# Altium PCB MiniPC.PcbDoc (part 5 of 24)
Units mm, origin at the board's own origin, x right, y up, seen from the top; angles counter-clockwise.
Board outline 175 x 155 mm, 16 copper layers (1_Top, 2_int1_(gnd), 3_int2_(power), 4_int3_(gnd), 5_int4_(sign), 6_int5_(power), 7_int6_(sign), 8_int7_(power), 9_int8_(gnd), 10_int9_(sign), 11_int10_(gnd), 12_int11_(sign), 13_int12_(gnd), 14_int13_(power), 15_int14_(gnd), 16_Bottom), stack 2.008 mm thick; 1046 components, 837 nets, 6010 pads, 4009 vias.
Unrouted connection lines stored in the file: 564.
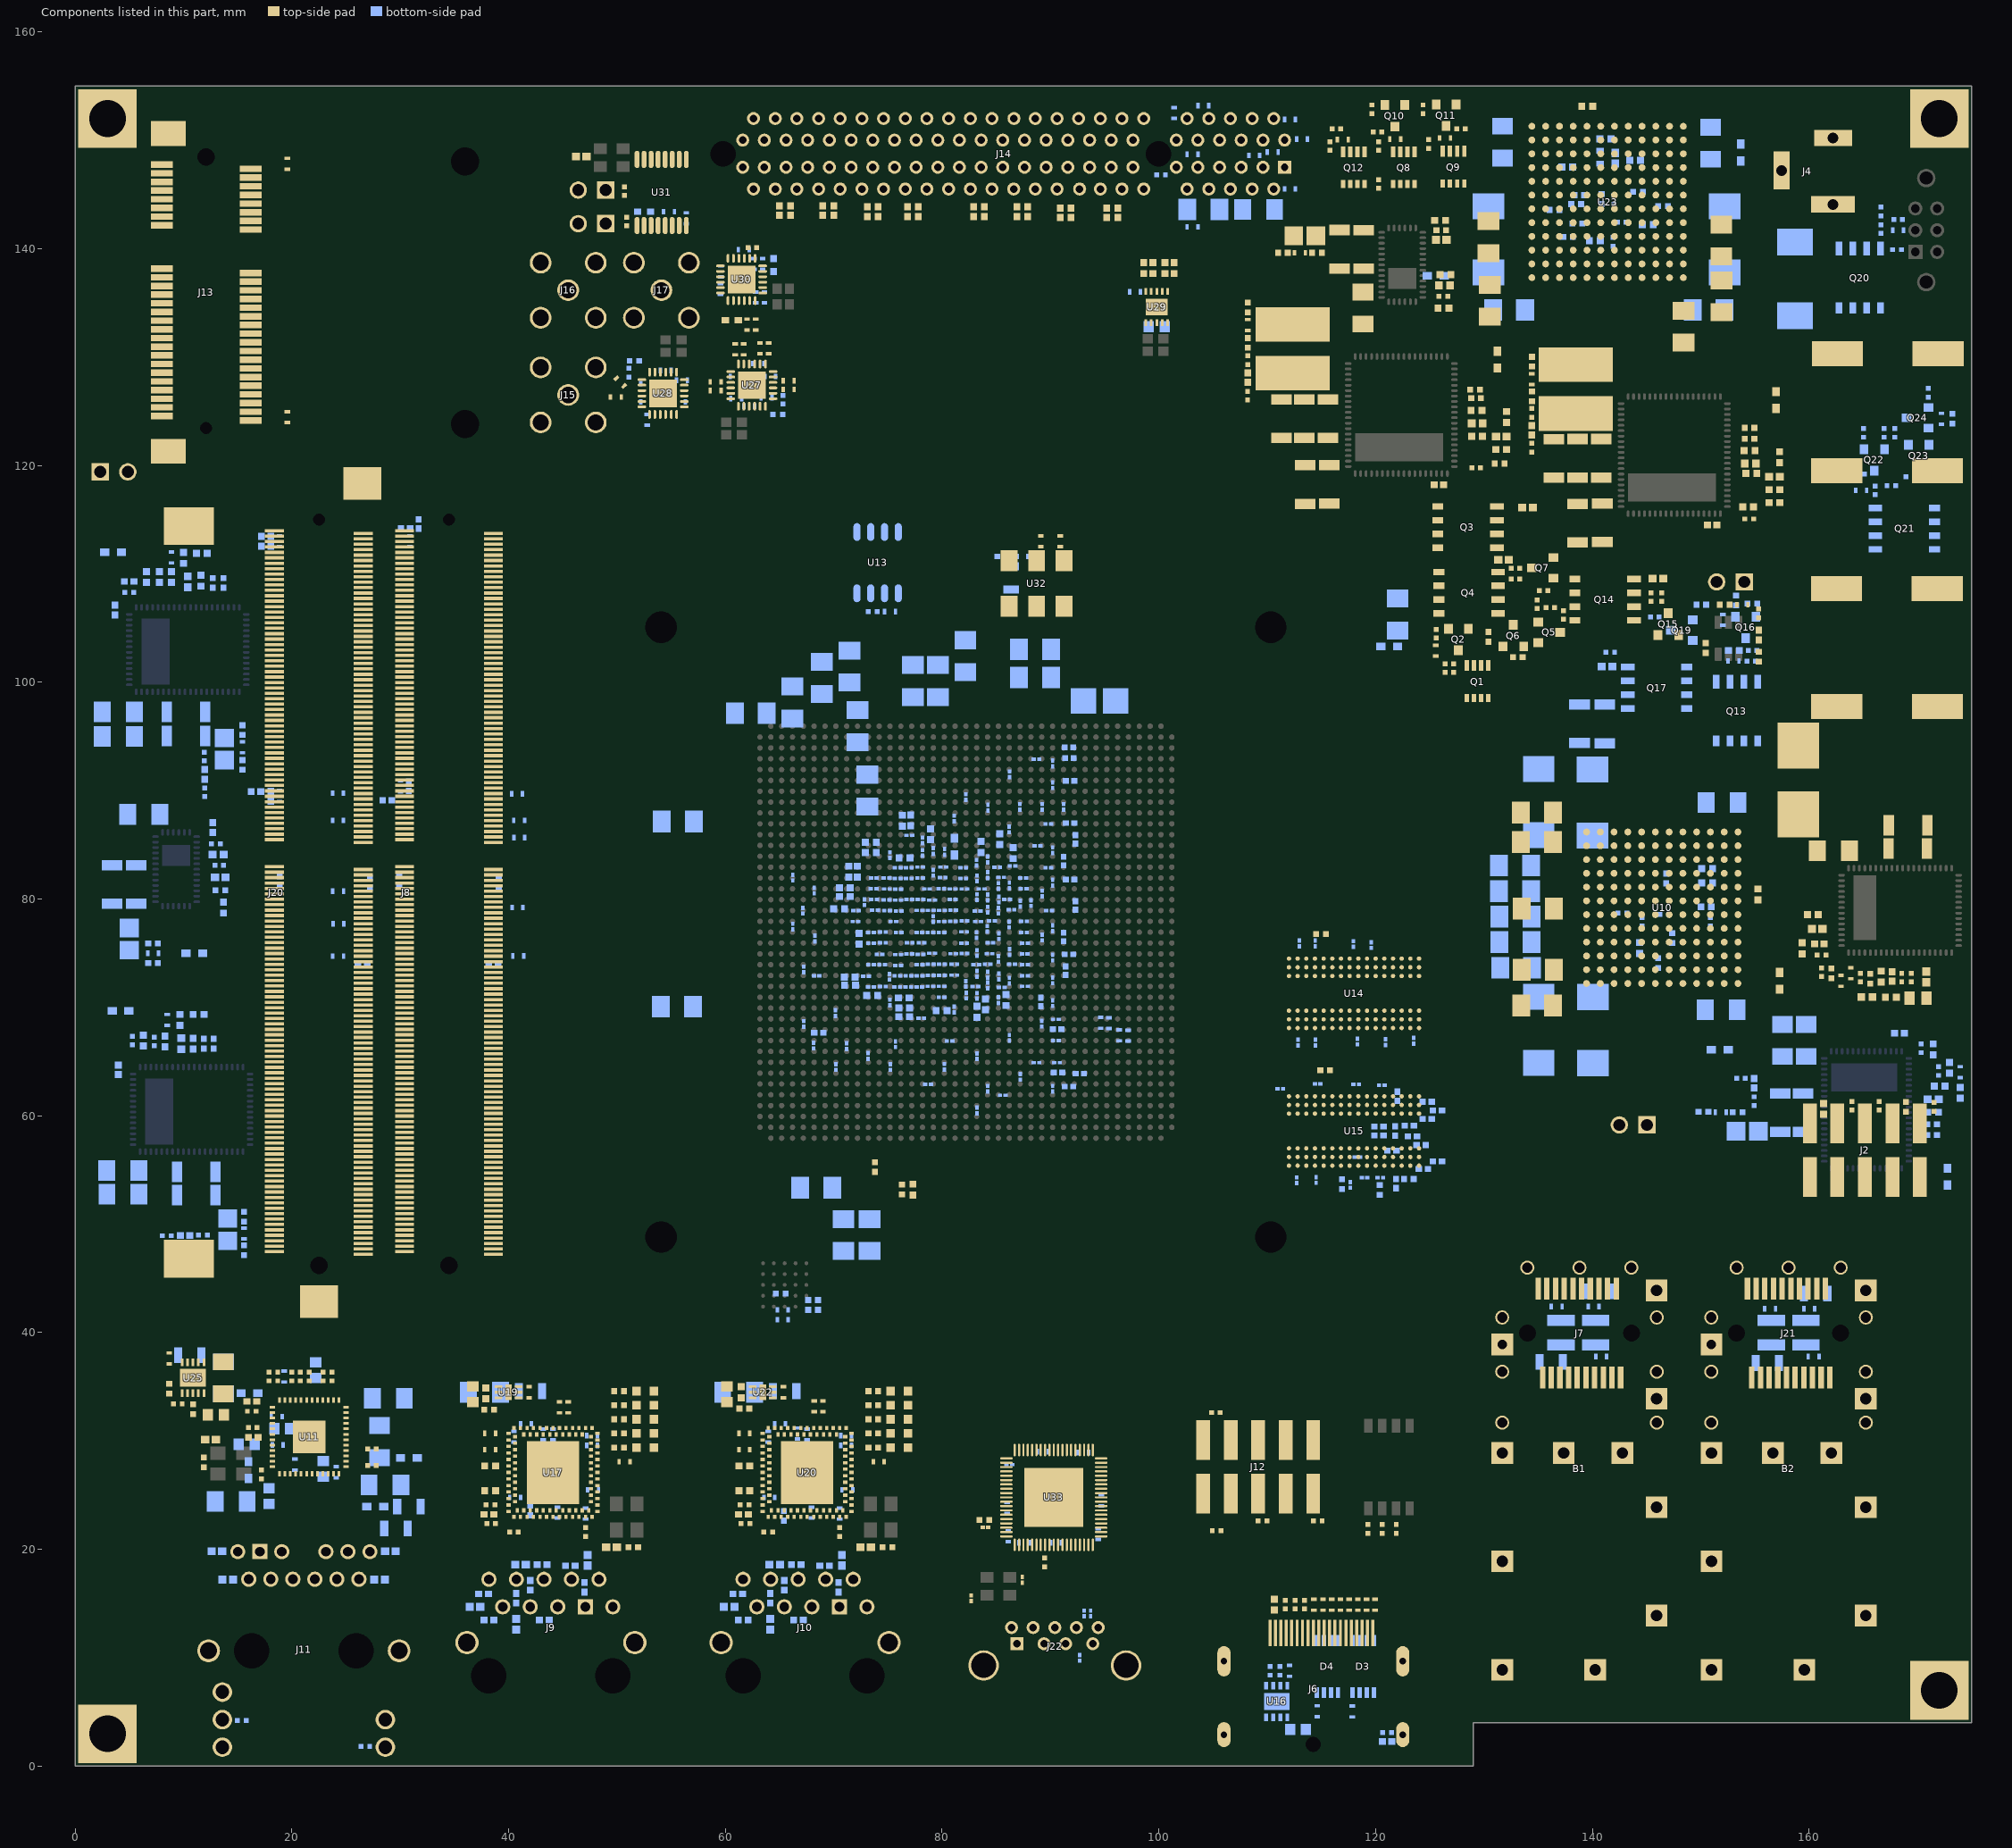
[diagram p19: the components of this part, seen from the top]

## Footprints (in the part's own frame and the unit in brackets; to place one, negate y for a bottom-side part, rotate by r counter-clockwise, add the part's x,y. Pads: shape width x height; smd on the part's side, far side on the other; paste and mask are expansions set on the pad) (continued)
FOXC-AS0A823-H4SB-7H_V [mm] "DIMM Socket, 260-Leads, Body Length 73.1mm, Pitch 0.5mm"
  rect 0.3x1.75 smd: 1(-33.375,-4.1) 2(-33.125,4.1) 3(-32.875,-4.1) 4(-32.625,4.1) 5(-32.375,-4.1) 6(-32.125,4.1) 7(-31.875,-4.1) 8(-31.625,4.1) 9(-31.375,-4.1) 10(-31.125,4.1) 11(-30.875,-4.1) 12(-30.625,4.1) 13(-30.375,-4.1) 14(-30.125,4.1) 15(-29.875,-4.1) 16(-29.625,4.1) 17(-29.375,-4.1) 18(-29.125,4.1) 19(-28.875,-4.1) 20(-28.625,4.1) 21(-28.375,-4.1) 22(-28.125,4.1) 23(-27.875,-4.1) 24(-27.625,4.1) 25(-27.375,-4.1) 26(-27.125,4.1) 27(-26.875,-4.1) 28(-26.625,4.1) 29(-26.375,-4.1) 30(-26.125,4.1) 31(-25.875,-4.1) 32(-25.625,4.1) 33(-25.375,-4.1) 34(-25.125,4.1) 35(-24.875,-4.1) 36(-24.625,4.1) 37(-24.375,-4.1) 38(-24.125,4.1) 39(-23.875,-4.1) 40(-23.625,4.1) 41(-23.375,-4.1) 42(-23.125,4.1) 43(-22.875,-4.1) 44(-22.625,4.1) 45(-22.375,-4.1) 46(-22.125,4.1) 47(-21.875,-4.1) 48(-21.625,4.1) 49(-21.375,-4.1) 50(-21.125,4.1) 51(-20.875,-4.1) 52(-20.625,4.1) 53(-20.375,-4.1) 54(-20.125,4.1) 55(-19.875,-4.1) 56(-19.625,4.1) 57(-19.375,-4.1) 58(-19.125,4.1) 59(-18.875,-4.1) 60(-18.625,4.1) 61(-18.375,-4.1) 62(-18.125,4.1) 63(-17.875,-4.1) 64(-17.625,4.1) 65(-17.375,-4.1) 66(-17.125,4.1) 67(-16.875,-4.1) 68(-16.625,4.1) 69(-16.375,-4.1) 70(-16.125,4.1) 71(-15.875,-4.1) 72(-15.625,4.1) 73(-15.375,-4.1) 74(-15.125,4.1) 75(-14.875,-4.1) 76(-14.625,4.1) 77(-14.375,-4.1) 78(-14.125,4.1) 79(-13.875,-4.1) 80(-13.625,4.1) 81(-13.375,-4.1) 82(-13.125,4.1) 83(-12.875,-4.1) 84(-12.625,4.1) 85(-12.375,-4.1) 86(-12.125,4.1) 87(-11.875,-4.1) 88(-11.625,4.1) 89(-11.375,-4.1) 90(-11.125,4.1) 91(-10.875,-4.1) 92(-10.625,4.1) 93(-10.375,-4.1) 94(-10.125,4.1) 95(-9.875,-4.1) 96(-9.625,4.1) 97(-9.375,-4.1) 98(-9.125,4.1) 99(-8.875,-4.1) 100(-8.625,4.1) 101(-8.375,-4.1) 102(-8.125,4.1) 103(-7.875,-4.1) 104(-7.625,4.1) 105(-7.375,-4.1) 106(-7.125,4.1) 107(-6.875,-4.1) 108(-6.625,4.1) 109(-6.375,-4.1) 110(-6.125,4.1) 111(-5.875,-4.1) 112(-5.625,4.1) 113(-5.375,-4.1) 114(-5.125,4.1) 115(-4.875,-4.1) 116(-4.625,4.1) 117(-4.375,-4.1) 118(-4.125,4.1) 119(-3.875,-4.1) 120(-3.625,4.1) 121(-3.375,-4.1) 122(-3.125,4.1) 123(-2.875,-4.1) 124(-2.625,4.1) 125(-2.375,-4.1) 126(-2.125,4.1) 127(-1.875,-4.1) 128(-1.625,4.1) 129(-1.375,-4.1) 130(-1.125,4.1) 131(-0.875,-4.1) 132(-0.625,4.1) 133(-0.375,-4.1) 134(-0.125,4.1) 135(0.125,-4.1) 136(0.375,4.1) 137(0.625,-4.1) 138(0.875,4.1) 139(1.125,-4.1) 140(1.375,4.1) 141(1.625,-4.1) 142(1.875,4.1) 143(2.125,-4.1) 144(2.375,4.1) 145(4.625,-4.1) 146(4.875,4.1) 147(5.125,-4.1) 148(5.375,4.1) 149(5.625,-4.1) 150(5.875,4.1) 151(6.125,-4.1) 152(6.375,4.1) 153(6.625,-4.1) 154(6.875,4.1) 155(7.125,-4.1) 156(7.375,4.1) 157(7.625,-4.1) 158(7.875,4.1) 159(8.125,-4.1) 160(8.375,4.1) 161(8.625,-4.1) 162(8.875,4.1) 163(9.125,-4.1) 164(9.375,4.1) 165(9.625,-4.1) 166(9.875,4.1) 167(10.125,-4.1) 168(10.375,4.1) 169(10.625,-4.1) 170(10.875,4.1) 171(11.125,-4.1) 172(11.375,4.1) 173(11.625,-4.1) 174(11.875,4.1) 175(12.125,-4.1) 176(12.375,4.1) 177(12.625,-4.1) 178(12.875,4.1) 179(13.125,-4.1) 180(13.375,4.1) 181(13.625,-4.1) 182(13.875,4.1) 183(14.125,-4.1) 184(14.375,4.1) 185(14.625,-4.1) 186(14.875,4.1) 187(15.125,-4.1) 188(15.375,4.1) 189(15.625,-4.1) 190(15.875,4.1) 191(16.125,-4.1) 192(16.375,4.1) 193(16.625,-4.1) 194(16.875,4.1) 195(17.125,-4.1) 196(17.375,4.1) 197(17.625,-4.1) 198(17.875,4.1) 199(18.125,-4.1) 200(18.375,4.1) 201(18.625,-4.1) 202(18.875,4.1) 203(19.125,-4.1) 204(19.375,4.1) 205(19.625,-4.1) 206(19.875,4.1) 207(20.125,-4.1) 208(20.375,4.1) 209(20.625,-4.1) 210(20.875,4.1) 211(21.125,-4.1) 212(21.375,4.1) 213(21.625,-4.1) 214(21.875,4.1) 215(22.125,-4.1) 216(22.375,4.1) 217(22.625,-4.1) 218(22.875,4.1) 219(23.125,-4.1) 220(23.375,4.1) 221(23.625,-4.1) 222(23.875,4.1) 223(24.125,-4.1) 224(24.375,4.1) 225(24.625,-4.1) 226(24.875,4.1) 227(25.125,-4.1) 228(25.375,4.1) 229(25.625,-4.1) 230(25.875,4.1) 231(26.125,-4.1) 232(26.375,4.1) 233(26.625,-4.1) 234(26.875,4.1) 235(27.125,-4.1) 236(27.375,4.1) 237(27.625,-4.1) 238(27.875,4.1) 239(28.125,-4.1) 240(28.375,4.1) 241(28.625,-4.1) 242(28.875,4.1) 243(29.125,-4.1) 244(29.375,4.1) 245(29.625,-4.1) 246(29.875,4.1) 247(30.125,-4.1) 248(30.375,4.1) 249(30.625,-4.1) 250(30.875,4.1) 251(31.125,-4.1) 252(31.375,4.1) 253(31.625,-4.1) 254(31.875,4.1) 255(32.125,-4.1) 256(32.375,4.1) 257(32.625,-4.1) 258(32.875,4.1) 259(33.125,-4.1) 260(33.375,4.1)
  round 1.3 hole 1.6 unplated: MH1(-34.4,0)
  round 0.8 hole 1.1 unplated: MH2(34.4,0)
  rect 3.5x4.6 smd: MP1(-33.8,12) MP2(33.8,12)
  silkscreen extent -36.54,-5.65 36.55,20.98, body extent -36.55,-4.78 36.55,20.98, height 4.11
FOXC-AS0A823-H8SB-7H_V [mm] "DIMM Socket, 260-Leads, Body Length 73.1mm, Pitch 0.5mm"
  rect 0.3x1.75 smd: 1(-33.375,-4.1) 2(-33.125,4.1) 3(-32.875,-4.1) 4(-32.625,4.1) 5(-32.375,-4.1) 6(-32.125,4.1) 7(-31.875,-4.1) 8(-31.625,4.1) 9(-31.375,-4.1) 10(-31.125,4.1) 11(-30.875,-4.1) 12(-30.625,4.1) 13(-30.375,-4.1) 14(-30.125,4.1) 15(-29.875,-4.1) 16(-29.625,4.1) 17(-29.375,-4.1) 18(-29.125,4.1) 19(-28.875,-4.1) 20(-28.625,4.1) 21(-28.375,-4.1) 22(-28.125,4.1) 23(-27.875,-4.1) 24(-27.625,4.1) 25(-27.375,-4.1) 26(-27.125,4.1) 27(-26.875,-4.1) 28(-26.625,4.1) 29(-26.375,-4.1) 30(-26.125,4.1) 31(-25.875,-4.1) 32(-25.625,4.1) 33(-25.375,-4.1) 34(-25.125,4.1) 35(-24.875,-4.1) 36(-24.625,4.1) 37(-24.375,-4.1) 38(-24.125,4.1) 39(-23.875,-4.1) 40(-23.625,4.1) 41(-23.375,-4.1) 42(-23.125,4.1) 43(-22.875,-4.1) 44(-22.625,4.1) 45(-22.375,-4.1) 46(-22.125,4.1) 47(-21.875,-4.1) 48(-21.625,4.1) 49(-21.375,-4.1) 50(-21.125,4.1) 51(-20.875,-4.1) 52(-20.625,4.1) 53(-20.375,-4.1) 54(-20.125,4.1) 55(-19.875,-4.1) 56(-19.625,4.1) 57(-19.375,-4.1) 58(-19.125,4.1) 59(-18.875,-4.1) 60(-18.625,4.1) 61(-18.375,-4.1) 62(-18.125,4.1) 63(-17.875,-4.1) 64(-17.625,4.1) 65(-17.375,-4.1) 66(-17.125,4.1) 67(-16.875,-4.1) 68(-16.625,4.1) 69(-16.375,-4.1) 70(-16.125,4.1) 71(-15.875,-4.1) 72(-15.625,4.1) 73(-15.375,-4.1) 74(-15.125,4.1) 75(-14.875,-4.1) 76(-14.625,4.1) 77(-14.375,-4.1) 78(-14.125,4.1) 79(-13.875,-4.1) 80(-13.625,4.1) 81(-13.375,-4.1) 82(-13.125,4.1) 83(-12.875,-4.1) 84(-12.625,4.1) 85(-12.375,-4.1) 86(-12.125,4.1) 87(-11.875,-4.1) 88(-11.625,4.1) 89(-11.375,-4.1) 90(-11.125,4.1) 91(-10.875,-4.1) 92(-10.625,4.1) 93(-10.375,-4.1) 94(-10.125,4.1) 95(-9.875,-4.1) 96(-9.625,4.1) 97(-9.375,-4.1) 98(-9.125,4.1) 99(-8.875,-4.1) 100(-8.625,4.1) 101(-8.375,-4.1) 102(-8.125,4.1) 103(-7.875,-4.1) 104(-7.625,4.1) 105(-7.375,-4.1) 106(-7.125,4.1) 107(-6.875,-4.1) 108(-6.625,4.1) 109(-6.375,-4.1) 110(-6.125,4.1) 111(-5.875,-4.1) 112(-5.625,4.1) 113(-5.375,-4.1) 114(-5.125,4.1) 115(-4.875,-4.1) 116(-4.625,4.1) 117(-4.375,-4.1) 118(-4.125,4.1) 119(-3.875,-4.1) 120(-3.625,4.1) 121(-3.375,-4.1) 122(-3.125,4.1) 123(-2.875,-4.1) 124(-2.625,4.1) 125(-2.375,-4.1) 126(-2.125,4.1) 127(-1.875,-4.1) 128(-1.625,4.1) 129(-1.375,-4.1) 130(-1.125,4.1) 131(-0.875,-4.1) 132(-0.625,4.1) 133(-0.375,-4.1) 134(-0.125,4.1) 135(0.125,-4.1) 136(0.375,4.1) 137(0.625,-4.1) 138(0.875,4.1) 139(1.125,-4.1) 140(1.375,4.1) 141(1.625,-4.1) 142(1.875,4.1) 143(2.125,-4.1) 144(2.375,4.1) 145(4.625,-4.1) 146(4.875,4.1) 147(5.125,-4.1) 148(5.375,4.1) 149(5.625,-4.1) 150(5.875,4.1) 151(6.125,-4.1) 152(6.375,4.1) 153(6.625,-4.1) 154(6.875,4.1) 155(7.125,-4.1) 156(7.375,4.1) 157(7.625,-4.1) 158(7.875,4.1) 159(8.125,-4.1) 160(8.375,4.1) 161(8.625,-4.1) 162(8.875,4.1) 163(9.125,-4.1) 164(9.375,4.1) 165(9.625,-4.1) 166(9.875,4.1) 167(10.125,-4.1) 168(10.375,4.1) 169(10.625,-4.1) 170(10.875,4.1) 171(11.125,-4.1) 172(11.375,4.1) 173(11.625,-4.1) 174(11.875,4.1) 175(12.125,-4.1) 176(12.375,4.1) 177(12.625,-4.1) 178(12.875,4.1) 179(13.125,-4.1) 180(13.375,4.1) 181(13.625,-4.1) 182(13.875,4.1) 183(14.125,-4.1) 184(14.375,4.1) 185(14.625,-4.1) 186(14.875,4.1) 187(15.125,-4.1) 188(15.375,4.1) 189(15.625,-4.1) 190(15.875,4.1) 191(16.125,-4.1) 192(16.375,4.1) 193(16.625,-4.1) 194(16.875,4.1) 195(17.125,-4.1) 196(17.375,4.1) 197(17.625,-4.1) 198(17.875,4.1) 199(18.125,-4.1) 200(18.375,4.1) 201(18.625,-4.1) 202(18.875,4.1) 203(19.125,-4.1) 204(19.375,4.1) 205(19.625,-4.1) 206(19.875,4.1) 207(20.125,-4.1) 208(20.375,4.1) 209(20.625,-4.1) 210(20.875,4.1) 211(21.125,-4.1) 212(21.375,4.1) 213(21.625,-4.1) 214(21.875,4.1) 215(22.125,-4.1) 216(22.375,4.1) 217(22.625,-4.1) 218(22.875,4.1) 219(23.125,-4.1) 220(23.375,4.1) 221(23.625,-4.1) 222(23.875,4.1) 223(24.125,-4.1) 224(24.375,4.1) 225(24.625,-4.1) 226(24.875,4.1) 227(25.125,-4.1) 228(25.375,4.1) 229(25.625,-4.1) 230(25.875,4.1) 231(26.125,-4.1) 232(26.375,4.1) 233(26.625,-4.1) 234(26.875,4.1) 235(27.125,-4.1) 236(27.375,4.1) 237(27.625,-4.1) 238(27.875,4.1) 239(28.125,-4.1) 240(28.375,4.1) 241(28.625,-4.1) 242(28.875,4.1) 243(29.125,-4.1) 244(29.375,4.1) 245(29.625,-4.1) 246(29.875,4.1) 247(30.125,-4.1) 248(30.375,4.1) 249(30.625,-4.1) 250(30.875,4.1) 251(31.125,-4.1) 252(31.375,4.1) 253(31.625,-4.1) 254(31.875,4.1) 255(32.125,-4.1) 256(32.375,4.1) 257(32.625,-4.1) 258(32.875,4.1) 259(33.125,-4.1) 260(33.375,4.1)
  round 1.3 hole 1.6 unplated: MH1(-34.4,0)
  round 0.8 hole 1.1 unplated: MH2(34.4,0)
  rect 3x3.5 smd: MP1(-37.75,12) MP2(37.75,8)
  silkscreen extent -36.55,-5.65 36.55,6.13, body extent -36.92,-4.77 36.95,18.7, height 9.12
FTDI-QFN-76_M [mm] "QFN, 76-Leads, Body 9.1x9.1mm, Pitch 0.4mm, Thermal Pad 5.45x5.45mm, IPC Low Density"
  oval 1.15x0.2 smd: 1(-4.375,3.6) 2(-4.375,3.2) 3(-4.375,2.8) 4(-4.375,2.4) 5(-4.375,2) 6(-4.375,1.6) 7(-4.375,1.2) 8(-4.375,0.8) 9(-4.375,0.4) 10(-4.375,0) 11(-4.375,-0.4) 12(-4.375,-0.8) 13(-4.375,-1.2) 14(-4.375,-1.6) 15(-4.375,-2) 16(-4.375,-2.4) 17(-4.375,-2.8) 18(-4.375,-3.2) 19(-4.375,-3.6) 39(4.375,-3.6) 40(4.375,-3.2) 41(4.375,-2.8) 42(4.375,-2.4) 43(4.375,-2) 44(4.375,-1.6) 45(4.375,-1.2) 46(4.375,-0.8) 47(4.375,-0.4) 48(4.375,0) 49(4.375,0.4) 50(4.375,0.8) 51(4.375,1.2) 52(4.375,1.6) 53(4.375,2) 54(4.375,2.4) 55(4.375,2.8) 56(4.375,3.2) 57(4.375,3.6)
  oval 0.2x1.15 smd: 20(-3.6,-4.375) 21(-3.2,-4.375) 22(-2.8,-4.375) 23(-2.4,-4.375) 24(-2,-4.375) 25(-1.6,-4.375) 26(-1.2,-4.375) 27(-0.8,-4.375) 28(-0.4,-4.375) 29(0,-4.375) 30(0.4,-4.375) 31(0.8,-4.375) 32(1.2,-4.375) 33(1.6,-4.375) 34(2,-4.375) 35(2.4,-4.375) 36(2.8,-4.375) 37(3.2,-4.375) 38(3.6,-4.375) 58(3.6,4.375) 59(3.2,4.375) 60(2.8,4.375) 61(2.4,4.375) 62(2,4.375) 63(1.6,4.375) 64(1.2,4.375) 65(0.8,4.375) 66(0.4,4.375) 67(0,4.375) 68(-0.4,4.375) 69(-0.8,4.375) 70(-1.2,4.375) 71(-1.6,4.375) 72(-2,4.375) 73(-2.4,4.375) 74(-2.8,4.375) 75(-3.2,4.375) 76(-3.6,4.375)
  rect 5.45x5.45 smd: 77(0,0)
  silkscreen extent -5.47,-4.7 4.7,4.7, body extent -4.55,-4.55 4.55,4.55, height 1
"FULL FAN MINI" [mm]
  body extent -35.62,-35.62 35.63,35.63, height 27.12
IDT-TSSOP-16_M [mm] "TSSOP, 16-Leads, Body 5.10x4.50mm, Pitch 0.65mm, IPC Low Density"
  oval 1.6x0.45 smd: 1(-3.05,2.275) 2(-3.05,1.625) 3(-3.05,0.975) 4(-3.05,0.325) 5(-3.05,-0.325) 6(-3.05,-0.975) 7(-3.05,-1.625) 8(-3.05,-2.275) 9(3.05,-2.275) 10(3.05,-1.625) 11(3.05,-0.975) 12(3.05,-0.325) 13(3.05,0.325) 14(3.05,0.975) 15(3.05,1.625) 16(3.05,2.275)
  silkscreen extent -3.17,-2.55 1.85,3.17, body extent -3.2,-2.55 3.2,2.55, height 1.2
KEMT-520-B-2_M [mm] "Molded Capacitor, 2-Leads, Body 3.7x3mm, IPC Low Density"
  rect 2.35x2.35 smd: 1(-1.475,0) 2(1.475,0)
  silkscreen extent -2.62,-1.5 1.85,1.85, body extent -1.85,-1.5 1.85,1.5, height 2.11
KOBI-16PJ032_V [mm] "THD, 3-Leads, Body 8.9916x13.4874mm"
  rect 1.5x4.05 hole 0.991 slot 3.505 at 90 deg: 1(-6.121,0)
  rect 3.5x1.5 hole 0.991 slot 2.997 at 0 deg: 2(-2.997,4.75)
  rect 1.5x3.5 hole 0.991 slot 2.997 at 90 deg: 3(0,0)
  silkscreen extent -7.55,-4.5 7.62,4.5, body extent -6.78,-4.5 7.62,5, height 11
LFUS-0154001.DR_V [mm] "SMD, 2-Leads, Body 9.73x5.03mm"
  rect 4.24x3.81 smd: 1(-3.185,0) 2(3.185,0)
  silkscreen extent -4.87,-2.52 4.86,2.51, body extent -4.87,-2.52 4.86,2.51, height 3.81
LHT-LTI-SASF54GT_V [mm] "THD, 5-Leads, Body 6.35x6.35mm, Pitch 2.54mm"
  round 2 hole 1.5: 1(0,0) 2(-2.54,2.54) 3(2.54,2.54) 4(-2.54,-2.54) 5(2.54,-2.54)
  silkscreen extent -3.17,-3.17 3.17,3.17, body extent -3.17,-3.17 3.18,3.18, height 9.5
LT-BGA-144-05-08-1920_V [mm] "BGA, 144-Balls, Body 16x16mm, Pitch 1.27mm"
  round 0.63 smd: A1(-6.985,6.985) A2(-5.715,6.985) A3(-4.445,6.985) A4(-3.175,6.985) A5(-1.905,6.985) A6(-0.635,6.985) A7(0.635,6.985) A8(1.905,6.985) A9(3.175,6.985) A10(4.445,6.985) A11(5.715,6.985) A12(6.985,6.985) B1(-6.985,5.715) B2(-5.715,5.715) B3(-4.445,5.715) B4(-3.175,5.715) B5(-1.905,5.715) B6(-0.635,5.715) B7(0.635,5.715) B8(1.905,5.715) B9(3.175,5.715) B10(4.445,5.715) B11(5.715,5.715) B12(6.985,5.715) C1(-6.985,4.445) C2(-5.715,4.445) C3(-4.445,4.445) C4(-3.175,4.445) C5(-1.905,4.445) C6(-0.635,4.445) C7(0.635,4.445) C8(1.905,4.445) C9(3.175,4.445) C10(4.445,4.445) C11(5.715,4.445) C12(6.985,4.445) D1(-6.985,3.175) D2(-5.715,3.175) D3(-4.445,3.175) D4(-3.175,3.175) D5(-1.905,3.175) D6(-0.635,3.175) D7(0.635,3.175) D8(1.905,3.175) D9(3.175,3.175) D10(4.445,3.175) D11(5.715,3.175) D12(6.985,3.175) E1(-6.985,1.905) E2(-5.715,1.905) E3(-4.445,1.905) E4(-3.175,1.905) E5(-1.905,1.905) E6(-0.635,1.905) E7(0.635,1.905) E8(1.905,1.905) E9(3.175,1.905) E10(4.445,1.905) E11(5.715,1.905) E12(6.985,1.905) F1(-6.985,0.635) F2(-5.715,0.635) F3(-4.445,0.635) F4(-3.175,0.635) F5(-1.905,0.635) F6(-0.635,0.635) F7(0.635,0.635) F8(1.905,0.635) F9(3.175,0.635) F10(4.445,0.635) F11(5.715,0.635) F12(6.985,0.635) G1(-6.985,-0.635) G2(-5.715,-0.635) G3(-4.445,-0.635) G4(-3.175,-0.635) G5(-1.905,-0.635) G6(-0.635,-0.635) G7(0.635,-0.635) G8(1.905,-0.635) G9(3.175,-0.635) G10(4.445,-0.635) G11(5.715,-0.635) G12(6.985,-0.635) H1(-6.985,-1.905) H2(-5.715,-1.905) H3(-4.445,-1.905) H4(-3.175,-1.905) H5(-1.905,-1.905) H6(-0.635,-1.905) H7(0.635,-1.905) H8(1.905,-1.905) H9(3.175,-1.905) H10(4.445,-1.905) H11(5.715,-1.905) H12(6.985,-1.905) J1(-6.985,-3.175) J2(-5.715,-3.175) J3(-4.445,-3.175) J4(-3.175,-3.175) J5(-1.905,-3.175) J6(-0.635,-3.175) J7(0.635,-3.175) J8(1.905,-3.175) J9(3.175,-3.175) J10(4.445,-3.175) J11(5.715,-3.175) J12(6.985,-3.175) K1(-6.985,-4.445) K2(-5.715,-4.445) K3(-4.445,-4.445) K4(-3.175,-4.445) K5(-1.905,-4.445) K6(-0.635,-4.445) K7(0.635,-4.445) K8(1.905,-4.445) K9(3.175,-4.445) K10(4.445,-4.445) K11(5.715,-4.445) K12(6.985,-4.445) L1(-6.985,-5.715) L2(-5.715,-5.715) L3(-4.445,-5.715) L4(-3.175,-5.715) L5(-1.905,-5.715) L6(-0.635,-5.715) L7(0.635,-5.715) L8(1.905,-5.715) L9(3.175,-5.715) L10(4.445,-5.715) L11(5.715,-5.715) L12(6.985,-5.715) M1(-6.985,-6.985) M2(-5.715,-6.985) M3(-4.445,-6.985) M4(-3.175,-6.985) M5(-1.905,-6.985) M6(-0.635,-6.985) M7(0.635,-6.985) M8(1.905,-6.985) M9(3.175,-6.985) M10(4.445,-6.985) M11(5.715,-6.985) M12(6.985,-6.985)
  silkscreen extent -8.77,-8 8,8, body extent -8,-8 8,8, height 5.21
LT-DC6-6_V [mm] "SON, 6-Leads, Body 2x2mm, Pitch 0.5mm, Thermal Pad 1.42x0.61mm"
  rect 0.7x0.25 smd mask+0.102: 1(-0.925,0.5) 2(-0.925,0) 4(0.925,-0.5) 5(0.925,0)
  rect 0.7x0.25 smd paste+0 mask+0.102: 3(-0.925,-0.5)
  rect 0.7x0.25 smd: 6(0.925,0.5)
  rect 0.61x1.42 smd: 7(0,0)
  silkscreen extent -1.5,-1.05 1.05,1.1, body extent -1,-1 1,1, height 0.8
LT-DD-10_V [mm] "SON, 10-Leads, Body 3x3mm, Pitch 0.5mm, Thermal Pad 2.38x1.65mm"
  rect 0.7x0.25 smd mask+0.102: 1(-1.425,1) 2(-1.425,0.5) 3(-1.425,0) 4(-1.425,-0.5) 5(-1.425,-1) 6(1.425,-1) 7(1.425,-0.5) 8(1.425,0) 9(1.425,0.5) 10(1.425,1)
  rect 1.65x2.38 smd mask+0.102: 11(0,0)
  silkscreen extent -2,-1.55 1.55,1.6, body extent -1.5,-1.5 1.5,1.5, height 0.8
LT-S8-8_M [mm] "SOIC, 8-Leads, Body 5x4mm, Pitch 1.27mm, IPC Low Density"
  oval 1.65x0.65 smd: 1(-2.825,1.905) 2(-2.825,0.635) 3(-2.825,-0.635) 4(-2.825,-1.905) 5(2.825,-1.905) 6(2.825,-0.635) 7(2.825,0.635) 8(2.825,1.905)
  silkscreen extent -2.95,-2.5 1.6,2.9, body extent -3,-2.5 3,2.5, height 1.75
MARV-NDC96 [mm] "QFN, 96-Leads, Body 9x9mm, Pitch 0.3mm, Thermal Pad 4.8x5.8mm"
  rect 0.4x0.3 smd: A1(-4.1,3.6) A2(-4.1,3) A3(-4.1,2.4) A4(-4.1,1.8) A5(-4.1,1.2) A6(-4.1,0.6) A7(-4.1,0) A8(-4.1,-0.6) A9(-4.1,-1.2) A10(-4.1,-1.8) A11(-4.1,-2.4) A12(-4.1,-3) A13(-4.1,-3.6) A27(4.1,-3.6) A28(4.1,-3) A29(4.1,-2.4) A30(4.1,-1.8) A31(4.1,-1.2) A32(4.1,-0.6) A33(4.1,0) A34(4.1,0.6) A35(4.1,1.2) A36(4.1,1.8) A37(4.1,2.4) A38(4.1,3) A39(4.1,3.6) B1(-3.5,3.3) B2(-3.5,2.7) B3(-3.5,2.1) B4(-3.5,1.5) B5(-3.5,0.9) B6(-3.5,0.3) B7(-3.5,-0.3) B8(-3.5,-0.9) B9(-3.5,-1.5) B10(-3.5,-2.1) B11(-3.5,-2.7) B24(3.5,-2.7) B25(3.5,-2.1) B26(3.5,-1.5) B27(3.5,-0.9) B28(3.5,-0.3) B29(3.5,0.3) B30(3.5,0.9) B31(3.5,1.5) B32(3.5,2.1) B33(3.5,2.7) B34(3.5,3.3)
  rect 0.3x0.4 smd: A14(-3.6,-4.1) A15(-3,-4.1) A16(-2.4,-4.1) A17(-1.8,-4.1) A18(-1.2,-4.1) A19(-0.6,-4.1) A20(0,-4.1) A21(0.6,-4.1) A22(1.2,-4.1) A23(1.8,-4.1) A24(2.4,-4.1) A25(3,-4.1) A26(3.6,-4.1) A40(3.6,4.1) A41(3,4.1) A42(2.4,4.1) A43(1.8,4.1) A44(1.2,4.1) A45(0.6,4.1) A46(0,4.1) A47(-0.6,4.1) A48(-1.2,4.1) A49(-1.8,4.1) A50(-2.4,4.1) A51(-3,4.1) A52(-3.6,4.1) B12(-3.3,-3.5) B13(-2.7,-3.5) B14(-2.1,-3.5) B15(-1.5,-3.5) B16(-0.9,-3.5) B17(-0.3,-3.5) B18(0.3,-3.5) B19(0.9,-3.5) B20(1.5,-3.5) B21(2.1,-3.5) B22(2.7,-3.5) B23(3.3,-3.5) B35(2.7,3.5) B36(2.1,3.5) B37(1.5,3.5) B38(0.9,3.5) B39(0.3,3.5) B40(-0.3,3.5) B41(-0.9,3.5) B42(-1.5,3.5) B43(-2.1,3.5) B44(-2.7,3.5)
  rect 4.8x5.8 smd: B45(0,0)
  silkscreen extent -4.97,-4.5 4.5,4.5, body extent -4.5,-4.5 4.5,4.5, height 0.8
MAXM-T833+2_V [mm] "SON, 8-Leads, Body 3x3 mm, Pitch 0.65mm, Thermal Pad 2.3x1.5mm"
  rect 0.7x0.35 smd: 1(-1.475,0.975) 2(-1.475,0.325) 3(-1.475,-0.325) 4(-1.475,-0.975) 5(1.475,-0.975) 6(1.475,-0.325) 7(1.475,0.325) 8(1.475,0.975)
  rect 1.58x2.35 smd: 9(0,0)
  silkscreen extent -2.15,-1.7 1.7,1.75, body extent -1.5,-1.5 1.5,1.5, height 0.8
MICL-QFN-48_V [mm] "QFN, 48-Leads, Body 7.05x7.05mm, Pitch 0.5mm"
  rect 0.5x0.25 smd: 1(-3.4,2.75) 2(-3.4,2.25) 3(-3.4,1.75) 4(-3.4,1.25) 5(-3.4,0.75) 6(-3.4,0.25) 7(-3.4,-0.25) 8(-3.4,-0.75) 9(-3.4,-1.25) 10(-3.4,-1.75) 11(-3.4,-2.25) 12(-3.4,-2.75) 25(3.4,-2.75) 26(3.4,-2.25) 27(3.4,-1.75) 28(3.4,-1.25) 29(3.4,-0.75) 30(3.4,-0.25) 31(3.4,0.25) 32(3.4,0.75) 33(3.4,1.25) 34(3.4,1.75) 35(3.4,2.25) 36(3.4,2.75)
  rect 0.25x0.5 smd: 13(-2.75,-3.4) 14(-2.25,-3.4) 15(-1.75,-3.4) 16(-1.25,-3.4) 17(-0.75,-3.4) 18(-0.25,-3.4) 19(0.25,-3.4) 20(0.75,-3.4) 21(1.25,-3.4) 22(1.75,-3.4) 23(2.25,-3.4) 24(2.75,-3.4) 37(2.75,3.4) 38(2.25,3.4) 39(1.75,3.4) 40(1.25,3.4) 41(0.75,3.4) 42(0.25,3.4) 43(-0.25,3.4) 44(-0.75,3.4) 45(-1.25,3.4) 46(-1.75,3.4) 47(-2.25,3.4) 48(-2.75,3.4)
  rect 3x3 smd paste-4: 49(0,0)
  silkscreen extent -4.32,2.62 -4.08,2.87, body extent -3.5,-3.5 3.5,3.5, height 0.9
MICT-LY-96_A [mm] "BGA, 96-Leads, Body 7.5x13.5mm, Pitch 0.8mm"
  round 0.4 smd mask-0.025: A1(-3.2,6) A2(-2.4,6) A3(-1.6,6) A7(1.6,6) A8(2.4,6) A9(3.2,6) B1(-3.2,5.2) B2(-2.4,5.2) B3(-1.6,5.2) B7(1.6,5.2) B8(2.4,5.2) B9(3.2,5.2) C1(-3.2,4.4) C2(-2.4,4.4) C3(-1.6,4.4) C7(1.6,4.4) C8(2.4,4.4) C9(3.2,4.4) D1(-3.2,3.6) D2(-2.4,3.6) D3(-1.6,3.6) D7(1.6,3.6) D8(2.4,3.6) D9(3.2,3.6) E1(-3.2,2.8) E2(-2.4,2.8) E3(-1.6,2.8) E7(1.6,2.8) E8(2.4,2.8) E9(3.2,2.8) F1(-3.2,2) F2(-2.4,2) F3(-1.6,2) F7(1.6,2) F8(2.4,2) F9(3.2,2) G1(-3.2,1.2) G2(-2.4,1.2) G3(-1.6,1.2) G7(1.6,1.2) G8(2.4,1.2) G9(3.2,1.2) H1(-3.2,0.4) H2(-2.4,0.4) H3(-1.6,0.4) H7(1.6,0.4) H8(2.4,0.4) H9(3.2,0.4) J1(-3.2,-0.4) J2(-2.4,-0.4) J3(-1.6,-0.4) J7(1.6,-0.4) J8(2.4,-0.4) J9(3.2,-0.4) K1(-3.2,-1.2) K2(-2.4,-1.2) K3(-1.6,-1.2) K7(1.6,-1.2) K8(2.4,-1.2) K9(3.2,-1.2) L1(-3.2,-2) L2(-2.4,-2) L3(-1.6,-2) L7(1.6,-2) L8(2.4,-2) L9(3.2,-2) M1(-3.2,-2.8) M2(-2.4,-2.8) M3(-1.6,-2.8) M7(1.6,-2.8) M8(2.4,-2.8) M9(3.2,-2.8) N1(-3.2,-3.6) N2(-2.4,-3.6) N3(-1.6,-3.6) N7(1.6,-3.6) N8(2.4,-3.6) N9(3.2,-3.6) P1(-3.2,-4.4) P2(-2.4,-4.4) P3(-1.6,-4.4) P7(1.6,-4.4) P8(2.4,-4.4) P9(3.2,-4.4) R1(-3.2,-5.2) R2(-2.4,-5.2) R3(-1.6,-5.2) R7(1.6,-5.2) R8(2.4,-5.2) R9(3.2,-5.2) T1(-3.2,-6) T2(-2.4,-6) T3(-1.6,-6) T7(1.6,-6) T8(2.4,-6) T9(3.2,-6)
  silkscreen extent -4.08,6.84 -3.84,7.08, body extent -3.75,-6.75 3.75,6.75, height 1.2
MOLX-74754-0101_V [mm] "SFP+ Cage, 1-Port, Body 49x15.9mm"
  rect 2x2 hole 1.05: MH1(-7.125,13.55) MH2(-7.125,3.55) MH3(-7.125,-6.45) MH4(-7.125,-16.45) MH6(7.125,-1.45) MH7(7.125,8.55) MH8(7.125,18.55) MH9(-1.455,18.55) MH10(-3.955,-1.45) MH11(1.445,-1.45)
  rect 2x2 hole 0.85: MH5(7.125,-11.45)
  round 1.3 hole 0.95: MH12(-7.13,-4.25) MH13(-7.13,-8.95) MH14(-7.13,-13.95) MH15(-4.8,-18.55) MH16(0,-18.55) MH17(4.8,-18.55) MH18(7.13,-13.95) MH19(7.13,-8.95) MH20(7.13,-4.25)
  silkscreen extent -7.95,-18.95 7.95,23.06, body extent -7.95,-18.94 7.95,30.05, height 10.21
MOLX-472720024_V [mm] "SMD, 20-Leads, Body 17.79x17.69mm, Pitch 0.5mm"
  rect 0.28x2.4 smd: 1(5.5,5.14) 2(5,5.14) 3(4.5,5.14) 4(4,5.14) 5(3.5,5.14) 6(3,5.14) 7(2.5,5.14) 8(2,5.14) 9(1.5,5.14) 10(1,5.14) 11(0.5,5.14) 12(0,5.14) 13(-0.5,5.14) 14(-1,5.14) 15(-1.5,5.14) 16(-2,5.14) 17(-2.5,5.14) 18(-3,5.14) 19(-3.5,5.14) 20(-4,5.14)
  oval 1.2x2.8 hole 0.6 slot 2.2 at 90 deg: 21(8.25,2.54) 22(-8.25,2.54)
  oval 1.2x2.3 hole 0.6 slot 1.7 at 90 deg: 23(8.25,-4.24) 24(-8.25,-4.24)
  round 1 hole 1.4 unplated: 25(0,-5.14)
  silkscreen extent -8.89,-8.42 8.9,7.01, body extent -8.89,-12.74 8.89,5.45, height 6.67
"Mounting Hole" [mm]
  rect 5.4x5.4 hole 3.4: MH1(0,0)
MSOP-8L [mm] "MSOP-8L, 8-Leads, Body 5x3mm, Pitch 0.5mm"
  rect 1.016x0.406 smd: 1(-2.4,0.975) 2(-2.4,0.325) 3(-2.4,-0.325) 4(-2.4,-0.975) 5(2.4,-0.975) 6(2.4,-0.325) 7(2.4,0.325) 8(2.4,0.975)
  silkscreen extent -3.81,-1.43 3.2,1.47, body extent -2.35,-1.52 2.55,1.48, height 0.94
MURA-BLM15-CHIP-2_V [mm] "Chip Ferrite Bead, 2-Leads, Body 1x0.5mm, Height 0.55mm, Reflow, 1.5A max Rated Current"
  rect 0.5x0.5 smd: 1(-0.45,0) 2(0.45,0)
  body extent -0.5,-0.25 0.5,0.25, height 0.55
MURA-BLM15AG221SN1x_V [mm] "Chip Bead, 2-Leads, Body 1x0.5mm"
  rect 0.5x0.5 smd: 1(-0.45,0) 2(0.45,0)
  body extent -0.52,-0.28 0.53,0.28, height 0.55
PNSC-EEH-ZA1E331P_M [mm] "CAPAE, 2-Leads, Body 10.5x10.5mm, IPC Low Density"
  rect 4.7x2.3 smd: 1(-4.65,0) 2(4.65,0)
  silkscreen extent -5.25,-5.25 5.25,5.25, body extent -5.9,-5.25 5.9,5.25, height 10.5
PNSC-TPF-D3L_V [mm] "Molded Capacitor, 2-Leads, Body 7.6x4.5mm"
  rect 2.4x2.9 smd: 1(-3.05,0) 2(3.05,0)
  silkscreen extent -4.52,-2.25 3.75,2.25, body extent -3.97,-2.25 3.97,2.25, height 3
RESC1005X35X25NL8T10 [mm] "Chip Resistor, 2-Leads, Body 1.1x0.6mm, IPC Medium Density"
  rect 0.65x0.6 smd: 1(-0.45,0) 2(0.45,0)
  body extent -0.55,-0.3 0.55,0.3, height 0.35
RESC1005X40X25LL05T05 [mm] "Chip Resistor, 2-Leads, Body 1.05x0.55mm, IPC High Density"
  rect 0.45x0.45 smd: 1(-0.4,0) 2(0.4,0)
  body extent -0.52,-0.27 0.52,0.28, height 0.4
RESC1005X40X25ML05T05 [mm] "Chip Resistor, 2-Leads, Body 1.05x0.55mm, IPC Low Density"
  rect 0.65x0.65 smd: 1(-0.5,0) 2(0.5,0)
  body extent -0.53,-0.28 0.53,0.28, height 0.4
RESC1005X40X25NL05T05 [mm] "Chip Resistor, 2-Leads, Body 1.05x0.55mm, IPC Medium Density"
  rect 0.55x0.55 smd: 1(-0.45,0) 2(0.45,0)
  body extent -0.52,-0.27 0.52,0.28, height 0.4
RESC1005X40X25NL5T10 [mm] "Chip Resistor, 2-Leads, Body 1.05x0.55mm, IPC Medium Density"
  rect 0.6x0.55 smd: 1(-0.425,0) 2(0.425,0)
  body extent -0.53,-0.28 0.53,0.28, height 0.4
RESC2013X70X40LL20T20 [mm] "Chip Resistor, 2-Leads, Body 2.2x1.35mm, IPC High Density"
  rect 0.95x1.25 smd: 1(-0.775,0) 2(0.775,0)
  body extent -1.1,-0.67 1.1,0.67, height 0.7
RESC3216X89X104LL25T25 [mm] "Chip Resistor, 2-Leads, Body 3.45x1.85mm, IPC High Density"
  rect 1.7x1.75 smd: 1(-1.025,0) 2(1.025,0)
  body extent -1.73,-0.92 1.73,0.92, height 0.89
SLAB-DFN-6-5000X7000DE_A_V [mm] "SON, 6-Leads, Body 7x5mm, Pitch 2.54mm"
  rect 1.95x1.55 smd mask+0.06: 1(-2.1,2.54) 2(-2.1,0) 3(-2.1,-2.54) 4(2.1,-2.54) 5(2.1,0) 6(2.1,2.54)
  silkscreen extent -2.95,3.6 -2.85,3.7, body extent -2.5,-3.5 2.5,3.5, height 1.8
SLAB-QFN-24-2550x2550TP_V [mm] "QFN, 24-Leads, Body 4.00x4.00mm, Pitch 0.50mm, Thermal Pad 2.55x2.55mm"
  oval 0.8x0.25 smd: 1(-1.95,1.25) 2(-1.95,0.75) 3(-1.95,0.25) 4(-1.95,-0.25) 5(-1.95,-0.75) 6(-1.95,-1.25) 13(1.95,-1.25) 14(1.95,-0.75) 15(1.95,-0.25) 16(1.95,0.25) 17(1.95,0.75) 18(1.95,1.25)
  oval 0.25x0.8 smd: 7(-1.25,-1.95) 8(-0.75,-1.95) 9(-0.25,-1.95) 10(0.25,-1.95) 11(0.75,-1.95) 12(1.25,-1.95) 19(1.25,1.95) 20(0.75,1.95) 21(0.25,1.95) 22(-0.25,1.95) 23(-0.75,1.95) 24(-1.25,1.95)
  rect 2.55x2.55 smd paste-3: 25(0,0)
  silkscreen extent -2.62,-2.15 2.15,2.92, body extent -2,-2 2,2, height 0.9
SLAB-TDFN-10_L [mm] "SON, 10-Leads, Body 3.00x3.00mm, Pitch 0.50mm, Thermal Pad 2.00x1.50mm, IPC High Density"
  rect 0.6x0.25 smd: 1(-1.44,1) 2(-1.44,0.5) 3(-1.44,0) 4(-1.44,-0.5) 5(-1.44,-1) 6(1.44,-1) 7(1.44,-0.5) 8(1.44,0) 9(1.44,0.5) 10(1.44,1)
  rect 1.5x2 smd: 11(0,0)
  silkscreen extent -2.1,-1.65 1.65,1.7, body extent -1.5,-1.5 1.5,1.5, height 0.8
SMD-0402 [mm] "Chip Inductor, 2-Leads, Body 1.0x0.5mm"
  rect 0.675x0.6 smd: 1(-0.6,0) 2(0.6,0)
  body extent -0.5,-0.25 0.5,0.25, height 0.49
SMD-0603 [mm] "Chip Inductor, 2-Leads, Body 1.6x0.8mm"
  rect 0.85x0.7 smd: 1(-0.775,0) 2(0.775,0)
  body extent -0.8,-0.4 0.8,0.4, height 0.79
SMTC-MECT-110-01-M-D-RA1_V [mm] "SMD, 20-Leads, Body 11x7.4mm, Pitch 0.8mm"
  rect 0.5x2 smd: 1(-3.4,-4.1) 2(-2.6,-4.1) 3(-1.8,-4.1) 4(-1,-4.1) 5(-0.2,-4.1) 6(0.6,-4.1) 7(1.4,-4.1) 8(2.2,-4.1) 9(3,-4.1) 10(3.8,-4.1) 11(3.4,4.1) 12(2.6,4.1) 13(1.8,4.1) 14(1,4.1) 15(0.2,4.1) 16(-0.6,4.1) 17(-1.4,4.1) 18(-2.2,4.1) 19(-3,4.1) 20(-3.8,4.1)
  round 0 hole 1.55 unplated: MH1(-4.8,0) MH2(4.8,0)
  silkscreen extent -5.5,-5.77 5.5,3.7, body extent -5.5,-4.55 5.5,4.55, height 5.16
SMTC-PCIE-098-02-F-D-TH_V [mm] "TH, 98-Leads, Body 56x8.61mm, Pitch 1mm"
  rect 1.2x1.2 hole 0.7: A1(25.017,-1.25)
  round 1.2 hole 0.7: A2(24.017,-3.25) A3(23.017,-1.25) A4(22.017,-3.25) A5(21.017,-1.25) A6(20.017,-3.25) A7(19.017,-1.25) A8(18.017,-3.25) A9(17.017,-1.25) A10(16.017,-3.25) A11(15.017,-1.25) A12(12.017,-3.25) A13(11.017,-1.25) A14(10.017,-3.25) A15(9.017,-1.25) A16(8.017,-3.25) A17(7.017,-1.25) A18(6.107,-3.25) A19(5.017,-1.25) A20(4.017,-3.25) A21(3.017,-1.25) A22(2.017,-3.25) A23(1.017,-1.25) A24(0.017,-3.25) A25(-0.983,-1.25) A26(-1.983,-3.25) A27(-2.983,-1.25) A28(-3.983,-3.25) A29(-4.983,-1.25) A30(-5.983,-3.25) A31(-6.983,-1.25) A32(-7.983,-3.25) A33(-8.983,-1.25) A34(-9.983,-3.25) A35(-10.983,-1.25) A36(-11.983,-3.25) A37(-12.983,-1.25) A38(-13.983,-3.25) A39(-14.983,-1.25) A40(-15.983,-3.25) A41(-16.983,-1.25) A42(-17.983,-3.25) A43(-18.983,-1.25) A44(-19.983,-3.25) A45(-20.983,-1.25) A46(-21.983,-3.25) A47(-22.983,-1.25) A48(-23.983,-3.25) A49(-24.983,-1.25) B1(25.017,1.25) B2(24.017,3.25) B3(23.017,1.25) B4(22.017,3.25) B5(21.017,1.25) B6(20.017,3.25) B7(19.017,1.25) B8(18.017,3.25) B9(17.017,1.25) B10(16.017,3.25) B11(15.017,1.25) B12(12.017,3.25) B13(11.017,1.25) B14(10.017,3.25) B15(9.017,1.25) B16(8.017,3.25) B17(7.017,1.25) B18(6.017,3.25) B19(5.017,1.25) B20(4.017,3.25) B21(3.017,1.25) B22(2.017,3.25) B23(1.017,1.25) B24(0.051,3.25) B25(-0.983,1.25) B26(-1.983,3.25) B27(-2.983,1.25) B28(-3.983,3.25) B29(-4.983,1.25) B30(-5.983,3.25) B31(-6.983,1.25) B32(-7.983,3.25) B33(-8.983,1.25) B34(-9.983,3.25) B35(-10.983,1.25) B36(-11.983,3.25) B37(-12.983,1.25) B38(-13.983,3.25) B39(-14.983,1.25) B40(-15.983,3.25) B41(-16.983,1.25) B42(-17.983,3.25) B43(-18.983,1.25) B44(-19.983,3.25) B45(-20.983,1.25) B46(-21.983,3.25) B47(-22.983,1.25) B48(-23.983,3.25) B49(-24.983,1.25)
  round 0 hole 2.35 unplated: MH1(13.367,0) MH2(-26.793,0)
  silkscreen extent -28,-4.47 28,4.96, body extent -28,-3.65 28,5.05, height 11.01
SMTC-TSM-105-01-T-DV_V [mm] "Connector, 10-Leads, Body 12.7x5.08mm, Pitch 2.54mm"
  rect 1.27x3.68 smd: 1(-5.08,-2.475) 2(-5.08,2.475) 3(-2.54,-2.475) 4(-2.54,2.475) 5(0,-2.475) 6(0,2.475) 7(2.54,-2.475) 8(2.54,2.475) 9(5.08,-2.475) 10(5.08,2.475)
  silkscreen extent -6.35,-4.99 6.35,2.54, body extent -6.35,-3.85 6.35,3.85, height 9.65
STAC-CSS2725-099H_V [mm] "Chip Resistor, 2-Leads, Body 7.06x6.7mm"
  rect 3.18x6.86 smd: 1(-2.25,0) 2(2.25,0)
  silkscreen extent -0.3,-3.33 0.3,3.33, body extent -3.53,-3.35 3.53,3.35, height 1.24
VISH-PPAK1212-8S_V [mm] "SMD, 8-Leads, Body 3.3x3.3mm, Pitch 0.66mm"
  rect 0.99x0.405 smd: 1(-1.435,0.99) 2(-1.435,0.33) 3(-1.435,-0.33) 4(-1.435,-0.99)
  rect 0.76x0.405 smd: 5(1.55,-0.99) 6(1.55,-0.33) 7(1.55,0.33) 8(1.55,0.99)
  1_Top region: -0.305,-1.118 1.42,-1.118 1.42,1.117 -0.305,1.117
  silkscreen extent -2.5,-1.65 1.65,1.65, body extent -1.65,-1.65 1.65,1.65, height 0.83
VISH-PPAKSO-8_V [mm] "SMD, 8-Leads, Body 4.9x5.89mm, Pitch 1.27mm"
  rect 1.27x0.61 smd: 1(-2.732,1.905) 2(-2.732,0.635) 3(-2.732,-0.635) 4(-2.732,-1.905)
  rect 1.02x0.61 smd: 5(2.733,-1.905) 6(2.733,-0.635) 7(2.733,0.635) 8(2.733,1.905)
  1_Top region: -1.278,-1.955 2.532,-1.955 2.532,1.955 -1.278,1.955
  silkscreen extent -2.03,-2.45 1.9,3.1, body extent -2.95,-2.45 2.95,2.45, height 1.12
WE-7499111001A_V [mm] "THD, 10-Leads, Body 21.84x16mm"
  rect 1.4x1.4 hole 0.89: 1(-3.175,-1.905)
  round 1.4 hole 0.89: 2(-1.905,-4.445) 3(0.635,-4.445) 4(1.905,-1.905) 5(-0.635,-1.905) 6(3.175,-4.445) 7(4.445,-1.905) 8(5.715,-4.445) 9(-4.445,-4.445) 10(-5.715,-1.905)
  round 0 hole 3.25 unplated: MH1(-5.715,4.445) MH2(5.715,4.445)
  round 2.15 hole 1.63: S1(-7.745,1.395) S2(7.745,1.395)
  silkscreen extent -8,-6.49 8,15.35, body extent -9.22,-6.26 9.22,15.34, height 14.82
WE-61300211121_V [mm] "Header, 2-Leads, Body 5.08x2.54mm, Pitch 2.54mm"
  rect 1.6x1.6 hole 1.1: 1(-1.27,0)
  round 1.6 hole 1.1: 2(1.27,0)
  silkscreen extent -3.31,-1.27 2.54,1.27, body extent -2.54,-1.27 2.54,1.27, height 8.54

## Part data
B1 B2: library part CMP-1704-00003-1, "SFP+ Cage, Single Port, Height 10.85 mm, Tail Height 3.05 mm, -40 to 85 degC, RoHS, Tray", Manufacturer=Molex, ComponentLink1Description="Manufacturer URL", ComponentLink1URL=http://www.molex.com/, ComponentLink2Description=Datasheet, ComponentLink2URL=http://www.molex.com/webdocs/datasheets/pdf/en-us/0747540101_IO_CONNECTORS.pdf, ComponentLink3Description="Package Specification", ComponentLink3URL=http://www.molex.com/pdm_docs/sd/747540101_sd.pdf, DatasheetVersion="Rev. Jul-15", Mounting Technology="Through Hole", PackageDescription="SFP+ Cage, Single Port, Height 10.85 mm, Tail Height 3.05 mm", PackageReference=74754-0101, PackageVersion="Rev. J, 02/2015", PartNumber=74754-0101
C1 C4 C5 C6 C7 C23 C26 C35 C44 C57 C60 C66 C73 C78 C109 C114 C327 C353 C384: library part CMP-1663-00006-2, "Chip Capacitor, 1 uF, +/- 10%, 25 V, -55 to 85 degC, 0402 (1005 Metric), RoHS, Tape and Reel", Capacitance="1 uF", Case/Package=0402, Case Code (Metric)=1005, Max Operating Temperature="85 degC", Min Operating Temperature="-55 degC", Package Quantity=1, Tolerance=10%, Case Code (Imperial)=0402, ComponentLink1Description="Manufacturer URL", ComponentLink1URL=http://www.tdk.com/, ComponentLink2Description=Datasheet, ComponentLink2URL=https://product.tdk.com/info/en/catalog/datasheets/mlcc_commercial_lowprofile_en.pdf, DatasheetVersion=04/2015, Length="0.039 inch", Mounting Technology="Surface Mount", PackageDescription="2-Pin Surface Mount Device, Body 1 x 0.5 mm", Packaging="Tape and Reel", PartNumber=CGB2A1X5R1E105K033BC, RoHSCompliant=True, Width="0.02 inch"
C2 C3 C67 C70 C310 C311 C312 C314 C318 C336 C337 C338 C340 C344 C362 C363 C364 C365 C366 C543: library part CMP-2008-04637-4, "Chip Capacitor, 10 nF, +/- 10%, 50 V, -55 to 125 degC, 0402 (1005 Metric), RoHS, Tape and Reel", Capacitance="10 nF", Case\/Package=0402, Case Code (Metric)=1005, Manufacturer="Basic Passives", Max Operating Temperature="125 degC", Min Operating Temperature="-55 degC", Package Quantity=10000, Tolerance=10%, Type (Capacitors)=X7R, Voltage Rating="50 V", Case Code (Imperial)=0402, ComponentLink1Description="Manufacturer URL", ComponentLink1URL=http://www.murata.com/, ComponentLink2Description=Datasheet, ComponentLink2URL=http://search.murata.co.jp/Ceramy/image/img/A01X/G101/ENG/GRM155R71H103KA88-01.pdf, DatasheetVersion=02/2016, Height="0.5 mm", Lead Pitch=2mm, Length="1 mm", Mount="Surface Mount", Mounting Technology="Surface Mount", PackageDescription="2-Pin Surface Mount Device, Body 1 x 0.5 mm", PackageReference=0402, Packaging="Tape and Reel", PartNumber=GRM155R71H103KA88D, Pins=2, Radiation Hardening=No, REACH SVHC="No SVHC", RoHSCompliant=true, Voltage Rating (DC)="50 V", Width="0.5 mm"
C8 C27 C36: library part CMP-1663-00008-2, "Chip Capacitor, 22 pF, +/- 5%, 50 V, -55 to 125 degC, 0402 (1005 Metric), RoHS, Tape and Reel", Capacitance="22 pF", Case\/Package=0402, Case Code (Metric)=1005, Max Operating Temperature="125 degC", Min Operating Temperature="-55 degC", Package Quantity=10000, Tolerance=5%, Type (Capacitors)=C0G, Voltage Rating="50 V", Case Code (Imperial)=0402, ComponentLink1Description="Manufacturer URL", ComponentLink1URL=http://www.tdk.com/, ComponentLink2Description=Datasheet, ComponentLink2URL=https://product.tdk.com/info/en/catalog/datasheets/mlcc_commercial_general_en.pdf, DatasheetVersion=08/2016, Height="0.5 mm", Length="1 mm", Mount="Surface Mount", Mounting Technology="Surface Mount", PackageDescription="2-Pin Surface Mount Device, Body 1 x 0.5 mm", PackageReference=0402, Packaging="Tape and Reel", PartNumber=C1005C0G1H220J050BA, Pins=2, Radiation Hardening=No, REACH SVHC="No SVHC", RoHSCompliant=true, Voltage Rating (DC)="50 V", Width="0.5 mm"
C9 C10 C28 C29 C37 C38 C45 C61 C85 C86 C99 C100 C116 C328 C354 C367 C371 C374 C378 C381 C385 C500: library part CMP-1662-00010-2, "Chip Capacitor, 22 uF, +/- 10%, 25 V, -55 to 85 degC, 1206 (3216 Metric), RoHS, Tape and Reel", Capacitance="22 uF", Case\/Package=1206, Case Code (Metric)=3216, Max Operating Temperature="85 degC", Min Operating Temperature="-55 degC", Package Quantity=2000, Tolerance=10%, Type (Capacitors)=X5R, Voltage Rating="25 V", Case Code (Imperial)=1206, ComponentLink1Description="Manufacturer URL", ComponentLink1URL=http://www.murata.com/, ComponentLink2Description=Datasheet, ComponentLink2URL=http://search.murata.co.jp/Ceramy/image/img/A01X/G101/ENG/GRM31CR61E226KE15-01.pdf, DatasheetVersion=03/2016, Height="1.6 mm", Length="3.2 mm", Mount="Surface Mount", Mounting Technology="Surface Mount", PackageDescription="2-Pin Surface Mount Device, Body 3.2 x 1.6 mm", PackageReference=1206, Packaging="Tape and Reel", PartNumber=GRM31CR61E226KE15L, Pins=2, Radiation Hardening=No, REACH SVHC="No SVHC", RoHSCompliant=true, Voltage Rating (DC)="25 V", Width="1.6 mm"
C11 C12 C18 C19 C20 C21 C22 C30 C31 C39 C40 C46 C47 C52 C53 C54 C55 C56 C62 C63 C71 C72 C112 C113: library part CMP-1663-00005-1, "Chip Capacitor, 47 uF, +/- 20%, 10 V, -55 to 85 degC, 1206 (3216 Metric), RoHS, Tape and Reel", Capacitance="47 uF", Case\/Package=1206, Case Code (Metric)=3216, Max Operating Temperature="85 degC", Min Operating Temperature="-55 degC", Package Quantity=2000, Tolerance=20%, Type (Capacitors)=X5R, Voltage Rating="10 V", Case Code (Imperial)=1206, ComponentLink1Description="Manufacturer URL", ComponentLink1URL=http://www.tdk.com/, ComponentLink2Description=Datasheet, ComponentLink2URL=https://product.tdk.com/info/en/catalog/datasheets/mlcc_commercial_general_en.pdf, DatasheetVersion=03/2015, Height="1.6 mm", Length="3.2 mm", Mount="Surface Mount", Mounting Technology="Surface Mount", PackageDescription="2-Pin Surface Mount Device, Body 3.2 x 1.6 mm", PackageReference=3216, Packaging="Tape and Reel", Radiation Hardening=No, RoHSCompliant=true, Voltage Rating (DC)="10 V", Width="1.6 mm"
C13 C15 C16 C25 C32 C34 C41 C43 C50 C59 C115 C484 C485 C486 C487 C488 C489 C490 C491 C492 C493 C494 C495 C496 C497 C498 C499: library part CMP-2008-04561-4, "Chip Capacitor, 220 nF, +/- 10%, 10 V, -55 to 85 degC, 0402 (1005 Metric), RoHS, Tape and Reel", Capacitance="220 nF", Case\/Package=0402, Case Code (Metric)=1005, Manufacturer="Basic Passives", Max Operating Temperature="85 degC", Min Operating Temperature="-55 degC", Package Quantity=1, Tolerance=10%, Type (Capacitors)=X5R, Voltage Rating="10 V", Case Code (Imperial)=0402, ComponentLink1Description="Manufacturer URL", ComponentLink1URL=http://www.murata.com/, ComponentLink2Description=Datasheet, ComponentLink2URL=http://search.murata.co.jp/Ceramy/image/img/A01X/G101/ENG/GRM155R61A224KE19-01.pdf, DatasheetVersion=03/2016, Height="0.5 mm", Length="1 mm", Mount="Surface Mount", Mounting Technology="Surface Mount", PackageDescription="2-Pin Surface Mount Device, Body 1 x 0.5 mm", PackageReference=0402, Packaging="Tape and Reel", PartNumber=GRM155R61A224KE19D, Pins=2, Radiation Hardening=No, REACH SVHC="No SVHC", RoHSCompliant=true, Voltage Rating (DC)="10 V", Width="0.5 mm"
C14 C24 C33 C42 C49 C58 C65: library part CMP-1666-00015-3, "Chip Capacitor, 15 nF, +/- 5%, 10 V, -55 to 125 degC, 0402 (1005 Metric), RoHS, Tape and Reel", Capacitance="15 nF", Case\/Package=0402, Case Code (Metric)=1005, Max Operating Temperature="125 degC", Min Operating Temperature="-55 degC", Package Quantity=50000, Tolerance=5%, Type (Capacitors)=X7R, Voltage Rating="10 V", Case Code (Imperial)=0402, ComponentLink1Description="Manufacturer URL", ComponentLink1URL=http://www.vishay.com/, ComponentLink2Description=Datasheet, ComponentLink2URL=http://www.vishay.com/docs/28548/vjw1bcbascomseries.pdf, DatasheetVersion=07/2016, Height="0.5 mm", Length="1 mm", Mount="Surface Mount", Mounting Technology="Surface Mount", PackageDescription="2-Pin Surface Mount Device, Body 1 x 0.5 mm", PackageReference=0402, Packaging="Tape and Reel", PartNumber=VJ0402Y153JXQPW1BC, Pins=2, RoHSCompliant=true, Voltage Rating (DC)="10 V", Width="0.5 mm"
C17 C51: library part CMP-1665-00021-1, "Chip Capacitor, 27 pF, +/- 5%, 50 V, -55 to 125 degC, 0402 (1005 Metric), RoHS, Tape and Reel", Capacitance="27 pF", Case\/Package=0402, Case Code (Metric)=1005, Max Operating Temperature="125 degC", Min Operating Temperature="-55 degC", Package Quantity=10000, Tolerance=5%, Type (Capacitors)=C0G, Voltage Rating="50 V", Case Code (Imperial)=0402, ComponentLink1Description="Manufacturer URL", ComponentLink1URL=http://www.panasonic.com/, ComponentLink2Description=Datasheet, ComponentLink2URL=http://media.digikey.com/pdf/Data%20Sheets/Panasonic%20Capacitors%20PDFs/ECJ_(General).pdf, DatasheetVersion=09/2008, Height="0.5 mm", Length="0.039 inch", Mount="Surface Mount", Mounting Technology="Surface Mount", PackageDescription="2-Pin Surface Mount Device, Body 1 x 0.5 mm", PackageReference=0402, Packaging="Tape and Reel", RoHSCompliant=true, Width="0.02 inch"
C48 C64: library part CMP-1665-00025-1, "Chip Capacitor,15 pF, +/- 5%, 50 V, -55 to 125 degC, 0402 (1005 Metric), RoHS, Tape and Reel", Capacitance="15 pF", Case\/Package=0402, Case Code (Metric)=1005, Max Operating Temperature="125 degC", Min Operating Temperature="-55 degC", Package Quantity=10000, Tolerance=5%, Type (Capacitors)=C0G, Voltage Rating="50 V", Case Code (Imperial)=0402, ComponentLink1Description="Manufacturer URL", ComponentLink1URL=http://www.panasonic.com/, ComponentLink2Description=Datasheet, ComponentLink2URL=http://www.mouser.com/ds/2/315/panasonic_abj0000ce4-327307.pdf, DatasheetVersion=09/2008, Height="0.5 mm", Length="0.039 inch", Mount="Surface Mount", Mounting Technology="Surface Mount", PackageDescription="2-Pin Surface Mount Device, Body 1 x 0.5 mm", PackageReference=0402, Packaging="Tape and Reel", RoHSCompliant=true, Width="0.02 inch"
C68 C69 C79 C131 C283 C284 C285 C286 C287 C288 C289 C290 C291 C292 C293 C294 C295 C296 C298 C299 C300 C301 C302 C303 C304 C305 C306 C307 C309 C313 C315 C316 C317 C319 C320 C321 C322 C323 C324 C325 C326 C331 C332 C333 C334 C335 C339 C341 C342 C343 C345 C346 C347 C348 C349 C350 C351 C352 C357 C358 C359 C360 C361 C369 C373 C380 C383 C387 C388 C389 C481 C482 C483 C501 C502 C503 C504 C505 C506 C507 C508 C510 C511 C512 C513 C514 C515 C516 C517 C518 C519 C520 C521 C522 C523 C524 C525 C526 C527 C528 C529 C530 C531 C532 C533 C534 C535 C536 C537 C538 C539 C540 C541 C544 C545 C546 C547 C548 C550 C551 C553 C555 C556 C558 C566 C567 C568 C570 C571 C572 C573 C574: library part CMP-1663-00009-2, "Chip Capacitor, 0.1 uF, +/- 20%, 25 V, -55 to 125 degC, 0402 (1005 Metric), RoHS, Tape and Reel", Capacitance="100 nF", Case\/Package=0402, Case Code (Metric)=1005, Max Operating Temperature="125 degC", Min Operating Temperature="-55 degC", Package Quantity=10000, Tolerance=20%, Type (Capacitors)=X7R, Voltage Rating="25 V", Case Code (Imperial)=0402, ComponentLink1Description="Manufacturer URL", ComponentLink1URL=http://www.tdk.com/, ComponentLink2Description=Datasheet, ComponentLink2URL=http://www.farnell.com/datasheets/1571323.pdf, DatasheetVersion=09/2011, Height="0.5 mm", Length="1 mm", Mount="Surface Mount", Mounting Technology="Surface Mount", PackageDescription="2-Pin Surface Mount Device, Body 1 x 0.5 mm", PackageReference=0402, Packaging="Tape and Reel", PartNumber=C1005X7R1E104M, Pins=2, RoHSCompliant=true, Voltage Rating (DC)="25 V", Width="0.5 mm"
C74 C75 C76 C77: library part CMP-1665-00032-1, "Aluminum Electrolytic Capacitor, 330 uF, +/- 20%, 25 V, -55 to 105 degC, 2-Pin CAPAE, RoHS, Tape and Reel", Capacitance="330 uF", Case\/Package=G, Max Operating Temperature="105 degC", Min Operating Temperature="-55 degC", Package Quantity=500, Tolerance=20%, Voltage Rating="25 V", ComponentLink1Description="Manufacturer URL", ComponentLink1URL=http://www.panasonic.com/, ComponentLink2Description=Datasheet, ComponentLink2URL=https://datasheet.ciiva.com/25613/0900766b81233638-25613835.pdf, DatasheetVersion=10/2014, Height="10.5 mm", Length="10.2 mm", Mount="Surface Mount", Mounting Technology="Surface Mount", PackageDescription="2-Pin Aluminum Electrolytic Capacitor, Body 10.2 x 10.2 mm, Diameter 10 mm", PackageReference=EEH-ZA1E331P, Packaging="Tape and Reel", Radiation Hardening=No, REACH SVHC=Unknown, RoHSCompliant=true, Voltage Rating (DC)="25 V"
C80 C81 C87 C88 C95 C101: library part CMP-1665-00019-2, "Tantalum Capacitor, 330 uF, +/- 20%, 6.3 V, -55 to 105 degC, 2-Pin Molded, RoHS, Tape and Reel", Capacitance="330 uF", Case/Package=2917, Max Operating Temperature="105 degC", Min Operating Temperature="-55 degC", Package Quantity=2500, ComponentLink1Description="Manufacturer URL", ComponentLink1URL=http://www.panasonic.com/, ComponentLink2Description=Datasheet, ComponentLink2URL=http://industrial.panasonic.com/cdbs/www-data/pdf/AAA8000/AAA8000C38.pdf, ComponentLink3Description="Package Specification", ComponentLink3URL=http://industrial.panasonic.com/cdbs/www-data/pdf/AAA8000/AAA8000COL34.pdf, DatasheetVersion=11/2015, Height="2.8 mm", Length="0.287 inch", Mount="Surface Mount", Mounting Technology="Surface Mount", PackageDescription="2-Pin Molded Capacitor, Body 7.3 x 4.3 mm", Packaging="Tape and Reel", PartNumber=6TPF330M9L, Radiation Hardening=No, REACH SVHC=Unknown, RoHSCompliant=True, Width="0.169 inch"
C82 C83 C84 C89 C90 C91 C92 C93 C96 C97 C98 C102 C103 C104 C105 C132 C133 C134 C135 C136 C137 C138 C139 C140 C141 C142 C147 C148 C149 C150 C151 C152 C161 C423 C509: library part CMP-1662-00011-2, "Chip Capacitor, 100 uF, +/- 20%, 6.3 V, -55 to 85 degC, 1206 (3216 Metric), RoHS, Tape and Reel", Capacitance="100 uF", Case\/Package=1206, Case Code (Metric)=3216, Max Operating Temperature="85 degC", Min Operating Temperature="-55 degC", Package Quantity=2000, Tolerance=20%, Type (Capacitors)=X5R, Voltage Rating="6.3 V", Case Code (Imperial)=1206, ComponentLink1Description="Manufacturer URL", ComponentLink1URL=http://www.murata.com/, ComponentLink2Description=Datasheet, ComponentLink2URL=http://psearch.en.murata.com/capacitor/product/GRM31CR60J107ME39%23.pdf, DatasheetVersion=09/2016, Height="1.6 mm", Length="3.2 mm", Mount="Surface Mount", Mounting Technology="Surface Mount", PackageDescription="2-Pin Surface Mount Device, Body 3.2 x 1.6 mm", PackageReference=1206, Packaging="Tape and Reel", PartNumber=GRM31CR60J107ME39L, Pins=2, Radiation Hardening=No, REACH SVHC="No SVHC", RoHSCompliant=true, Voltage Rating (DC)="6.3 V", Width="1.6 mm"
C94: library part CMP-1666-00016-3, "Chip Capacitor, 1.8 nF, +/- 5%, 16 V, -55 to 125 degC, 0402 (1005 Metric), RoHS, Tape and Reel", Capacitance="1800 pF", Case\/Package=0402, Case Code (Metric)=1005, Max Operating Temperature="125 degC", Min Operating Temperature="-55 degC", Package Quantity=10000, Tolerance=5%, Type (Capacitors)=X7R, Voltage Rating="16 V", Case Code (Imperial)=0402, ComponentLink1Description="Manufacturer URL", ComponentLink1URL=http://www.vishay.com/, ComponentLink2Description=Datasheet, ComponentLink2URL=http://www.vishay.com/docs/28548/vjw1bcbascomseries.pdf, DatasheetVersion=07/2016, Height="0.5 mm", Length="1 mm", Mount="Surface Mount", Mounting Technology="Surface Mount", PackageDescription="2-Pin Surface Mount Device, Body 1 x 0.5 mm", PackageReference=0402, Packaging="Tape and Reel", PartNumber=VJ0402Y182JXJCW1BC, Pins=2, RoHSCompliant=true, Voltage Rating (DC)="16 V", Width="0.5 mm"
C106: library part CMP-1665-00023-1, "Chip Capacitor, 68 pF, +/- 5%, 50 V, -55 to 125 degC, 0402 (1005 Metric), RoHS, Tape and Reel", Capacitance="68 pF", Case\/Package=0402, Case Code (Metric)=1005, Max Operating Temperature="125 degC", Min Operating Temperature="-55 degC", Package Quantity=1, Tolerance=5%, Type (Capacitors)=C0G, Voltage Rating="50 V", Case Code (Imperial)=0402, ComponentLink1Description="Manufacturer URL", ComponentLink1URL=http://www.panasonic.com/, ComponentLink2Description=Datasheet, ComponentLink2URL=http://media.digikey.com/pdf/Data%20Sheets/Panasonic%20Capacitors%20PDFs/ECJ_(General).pdf, DatasheetVersion=09/2008, Height="0.5 mm", Length="0.039 inch", Mount="Surface Mount", Mounting Technology="Surface Mount", PackageDescription="2-Pin Surface Mount Device, Body 1 x 0.5 mm", PackageReference=0402, Packaging="Cut Tape", RoHSCompliant=true, Width="0.02 inch"
C107: library part CMP-1663-00010-2, "Chip Capacitor, 2.2 nF, +/- 10%, 25 V, -55 to 125 degC, 0402 (1005 Metric), RoHS, Tape and Reel", Capacitance="2.2 nF", Case\/Package=0402, Case Code (Metric)=1005, Max Operating Temperature="125 degC", Min Operating Temperature="-55 degC", Package Quantity=1, Tolerance=10%, Type (Capacitors)=X7R, Voltage Rating="25 V", Case Code (Imperial)=0402, ComponentLink1Description="Manufacturer URL", ComponentLink1URL=http://www.tdk.com/, ComponentLink2Description=Datasheet, ComponentLink2URL=https://product.tdk.com/info/en/documents/chara_sheet/CGJ2B2X7R1E222K050BA.pdf, DatasheetVersion=01/2016, Height="0.5 mm", Length="1 mm", Mount="Surface Mount", Mounting Technology="Surface Mount", PackageDescription="2-Pin Surface Mount Device, Body 1 x 0.5 mm", PackageReference=0402, Packaging="Tape and Reel", PartNumber=CGJ2B2X7R1E222K050BA, Pins=2, Radiation Hardening=No, RoHSCompliant=true, Voltage Rating (DC)="25 V", Width="0.5 mm"
C108: library part CMP-2008-04685-4, "Chip Capacitor, 56 pF, +/- 5%, 50 V, -55 to 125 degC, 0402 (1005 Metric), RoHS, Tape and Reel", Capacitance="56 pF", Case\/Package=0402, Case Code (Metric)=1005, Manufacturer="Basic Passives", Max Operating Temperature="125 degC", Min Operating Temperature="-55 degC", Package Quantity=1, Tolerance=5%, Type (Capacitors)=C0G, Voltage Rating="50 V", Case Code (Imperial)=0402, ComponentLink1Description="Manufacturer URL", ComponentLink1URL=http://www.murata.com/, ComponentLink2Description=Datasheet, ComponentLink2URL=http://search.murata.co.jp/Ceramy/image/img/A01X/G101/ENG/GRM1535C1H560JDD5-01.pdf, DatasheetVersion=01/2013, Height="0.3 mm", Length="0.039 inch", Mount="Surface Mount", Mounting Technology="Surface Mount", PackageDescription="2-Pin Surface Mount Device, Body 1 x 0.5 mm", PackageReference=0402, Packaging="Cut Tape", PartNumber=GRM1535C1H560JDD5D, Pins=2, Radiation Hardening=No, RoHSCompliant=true, Voltage Rating (DC)="50 V", Width="0.02 inch"
C110: library part CMP-2008-04630-4, "Chip Capacitor, 47 nF, +/- 10%, 25 V, -55 to 125 degC, 0402 (1005 Metric), RoHS, Tape and Reel", Capacitance="47 nF", Case\/Package=0402, Case Code (Metric)=1005, Manufacturer="Basic Passives", Max Operating Temperature="125 degC", Min Operating Temperature="-55 degC", Package Quantity=10000, Tolerance=10%, Type (Capacitors)=X7R, Voltage Rating="25 V", Case Code (Imperial)=0402, ComponentLink1Description="Manufacturer URL", ComponentLink1URL=http://www.murata.com/, ComponentLink2Description=Datasheet, ComponentLink2URL=http://search.murata.co.jp/Ceramy/image/img/A01X/G101/ENG/GRM155R71E473KA88-01.pdf, DatasheetVersion=02/2016, Height="0.5 mm", Lead Pitch="2 mm", Length="1 mm", Mount="Surface Mount", Mounting Technology="Surface Mount", PackageDescription="2-Pin Surface Mount Device, Body 1 x 0.5 mm", PackageReference=0402, Packaging="Tape and Reel", PartNumber=GRM155R71E473KA88D, Pins=2, Radiation Hardening=No, REACH SVHC="No SVHC", RoHSCompliant=true, Voltage Rating (DC)="25 V", Width="0.5 mm"